# Altium PCB Touch_Board_AB.PcbDoc
Units mil, origin at the board's own origin, x right, y up, seen from the top; angles counter-clockwise.
Board outline 5551.18 x 1023.62 mil, 2 copper layers (Top Layer, Bottom Layer), stack 57 mil thick; 44 components, 30 nets, 101 pads, 32 vias.
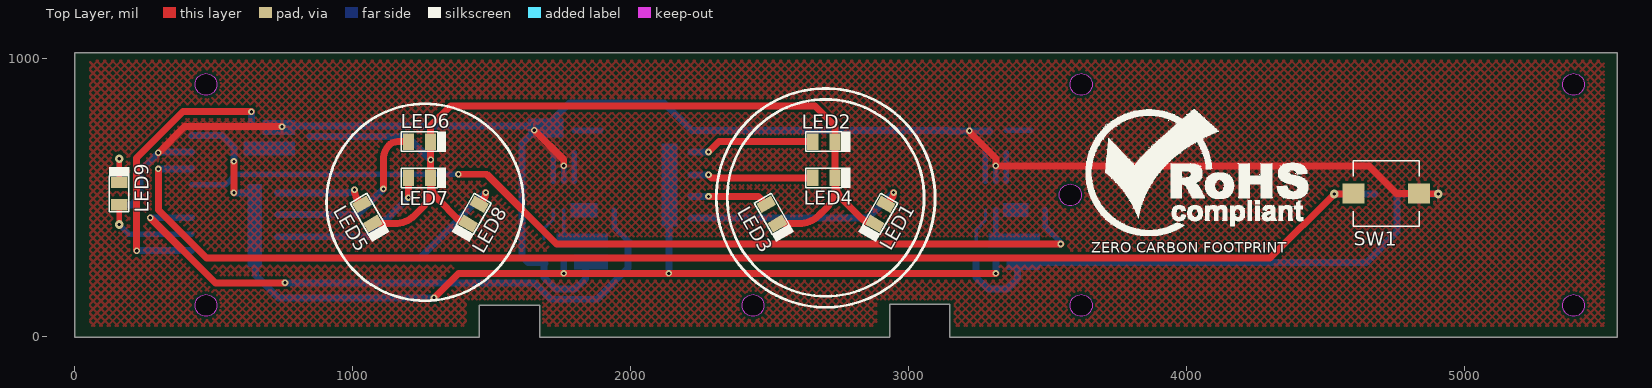
[diagram p0: Top Layer view]
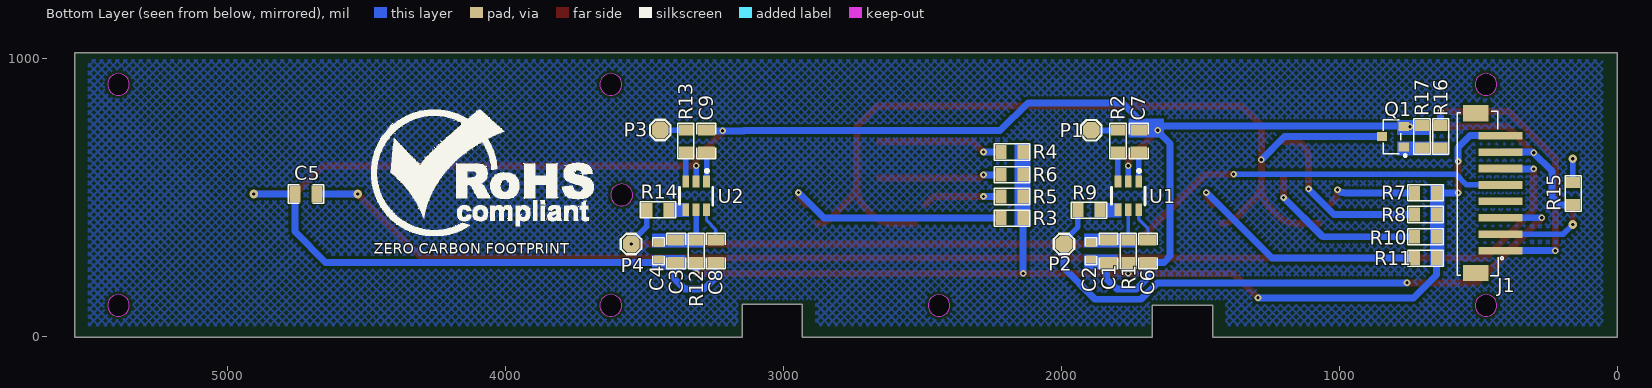
[diagram p1: Bottom Layer view, seen from below]
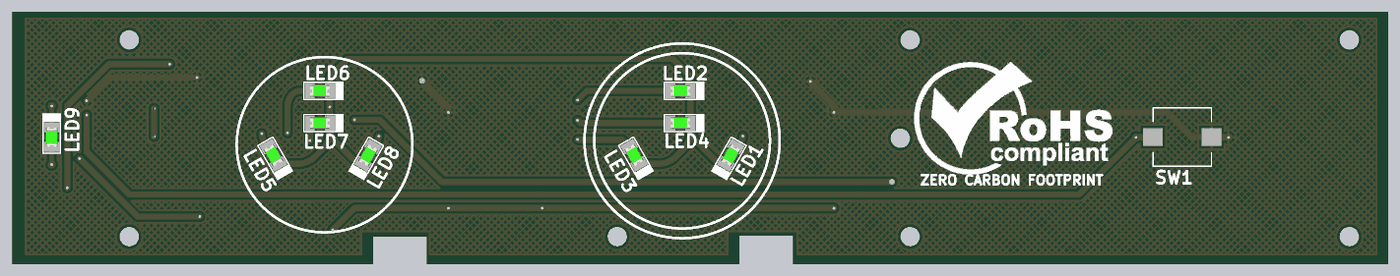
[diagram p2: 3D render of the assembled board from above, using the file's embedded part models]
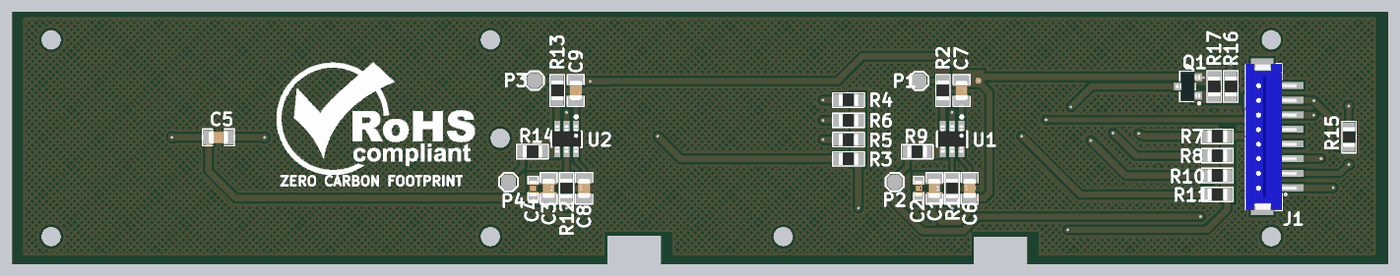
[diagram p3: 3D render of the assembled board from below, using the file's embedded part models]

## Layer stack, top to bottom
Top Solder: solder mask 3, Solder Resist, Dk 3.5
Top Layer: signal copper 10
Dielectric 1: dielectric 37, FR-4, Dk 4.8
Bottom Layer: signal copper 10
Bottom Solder: solder mask 3, Solder Resist, Dk 3.5

## Board outline
0.12,-1.29 0.12,1022.33 5551.3,1022.33 5551.3,-1.29 3149.72,-1.29 3149.72,116.82 2933.19,116.82 2933.19,-1.29 1673.34,-1.29 1673.34,112.88 1456.81,112.88 1456.81,-1.29
cut-out: 2441.06,73.51 cw(c2441.06,112.88) 2401.69,112.88 cw(c2441.06,112.88) 2441.06,152.25 cw(c2441.06,112.88) 2480.43,112.88 cw(c2441.06,112.88)
cut-out: 5393.82,868.79 cw(c5393.82,908.16) 5354.45,908.16 cw(c5393.82,908.16) 5393.82,947.53 cw(c5393.82,908.16) 5433.19,908.16 cw(c5393.82,908.16)
cut-out: 5393.82,73.51 cw(c5393.82,112.88) 5354.45,112.88 cw(c5393.82,112.88) 5393.82,152.25 cw(c5393.82,112.88) 5433.19,112.88 cw(c5393.82,112.88)
cut-out: 3622.16,73.51 cw(c3622.16,112.88) 3582.79,112.88 cw(c3622.16,112.88) 3622.16,152.25 cw(c3622.16,112.88) 3661.53,112.88 cw(c3622.16,112.88)
cut-out: 3582.79,471.15 cw(c3582.79,510.52) 3543.42,510.52 cw(c3582.79,510.52) 3582.79,549.89 cw(c3582.79,510.52) 3622.16,510.52 cw(c3582.79,510.52)
cut-out: 3622.16,868.79 cw(c3622.16,908.16) 3582.79,908.16 cw(c3622.16,908.16) 3622.16,947.53 cw(c3622.16,908.16) 3661.53,908.16 cw(c3622.16,908.16)
cut-out: 472.56,73.51 cw(c472.56,112.88) 433.19,112.88 cw(c472.56,112.88) 472.56,152.25 cw(c472.56,112.88) 511.93,112.88 cw(c472.56,112.88)
cut-out: 472.56,868.79 cw(c472.56,908.16) 433.19,908.16 cw(c472.56,908.16) 472.56,947.53 cw(c472.56,908.16) 511.93,908.16 cw(c472.56,908.16)

## Design rules (kind name [scope] priority, off if disabled: settings)
Clearance [All] p1: gap=10 ignorepadtopadclearanceinfootprint=FALSE except(0: Arc-Hole Track-Hole SMDPad-Hole THPad-Hole Via-Hole Fill-Hole Poly-Hole Region-Hole Text-Hole)
ComponentClearance [All] p1: gap=0 collisioncheckmode=3 verticalgap=0 showdistances=FALSE
HoleSize [All] p1: absolutevalues=TRUE maxlimit=1000 minlimit=1 maxpercent=80.000 minpercent=20.000
HoleToHoleClearance [All] p1: gap=0 allowstackedmicrovias=TRUE
MinimumSolderMaskSliver [All] p1: minsoldermaskwidth=0
PolygonConnect [All] p1: connectstyle=Relief reliefconductorwidth=10 reliefentries=4 polygonreliefangle="90 Angle" airgapwidth=10
RoutingVias [All] p1: holewidth=11.81 width=23.62 viastyle="Through Hole" minholewidth=7.87 minwidth=17.72 maxholewidth=11.81 maxwidth=23.62
SilkToSilkClearance [All] p1: silktosilkclearance=0
SilkToSolderMaskClearance [IsPad] p1: minsilkscreentomaskgap=0 clearancetoexposedcopper=TRUE
SolderMaskExpansion SolderMaskExpansion_1 [IsVia] p1: expansion=4 istentingtop=FALSE soldermaskfromhole=TRUE
SolderMaskExpansion [Not IsVia] p2: expansion=4 istentingtop=FALSE
Width [All] p1: maxlimit=100 minlimit=10 preferedwidth=12 minimp=50.000000 maximp=50.000000 favimp=50.000000
24 further rules are at their usual default settings.

## Classes and differential pairs
component class U_Touch_Sensor_Section: C1 C2 C3 C4 C6 C7 C8 C9 P1 P2 P3 P4 R1 R2 R9 R12 R13 R14 U1 U2
component class U_LED_Section: C5 J1 LED1 LED2 LED3 LED4 LED5 LED6 LED7 LED8 LED9 Q1 R3 R4 R5 R6 R7 R8 R10 R11 R15 R16 R17 SW1

## Components (designator, comment, footprint, x,y, rotation, side; value= is the part's Value field where it differs from the comment)
C1 "0.1uF" Cap0805 1831,308 r270 bottom
C2 "10uF" Cap0603 1894,308 r270 bottom
C3 "0.1uF" Cap0805 3387,308 r270 bottom
C4 "10uF" Cap0603 3450,308 r270 bottom
C5 "0.1uF" Cap0805 4719,514 r0 bottom
C6 "0.1uF" Cap0805 1689,308 r90 bottom
C7 "0.1uF" Cap0805 1722,704 r270 bottom
C8 "0.1uF" Cap0805 3244,308 r90 bottom
C9 "0.1uF" Cap0805 3278,704 r270 bottom
J1 "B8B-ZR-SM4-TF(LF)(SN)" B8B-ZR-SM4-TF(LF)(SN) 465,516.9 r90 bottom locked
LED1 "150080GS75000" "LED 0805" 2899,442 r240 top
LED2 "150080GS75000" "LED 0805" 2696,702 r0 top
LED3 "150080GS75000" "LED 0805" 2509,442 r300 top
LED4 "150080GS75000" "LED 0805" 2696,572 r0 top
LED5 "150080GS75000" "LED 0805" 1054,442 r300 top
LED6 "150080GS75000" "LED 0805" 1241,702 r0 top
LED7 "150080GS75000" "LED 0805" 1241,572 r0 top
LED8 "150080GS75000" "LED 0805" 1436,442 r240 top
LED9 "150080GS75000" "LED 0805" 160,515 r90 top locked
P1 "Test Point" "TEST POINT" 1893,743 r180 bottom
P2 "Test Point" "TEST POINT" 1991,334 r180 bottom
P3 "Test Point" "TEST POINT" 3444,744 r180 bottom
P4 "Test Point" "TEST POINT" 3549,334 r180 bottom
Q1 "S8050" sot-23 808,720 r90 bottom
R1 "100R" "RES 0805" 1760,308 r270 bottom
R2 "10K" "RES 0805" 1797,704 r270 bottom
R3 "100R" "RES 0805" 2178,427 r180 bottom
R4 "100R" "RES 0805" 2178,665 r180 bottom
R5 "100R" "RES 0805" 2178,505 r180 bottom
R6 "100R" "RES 0805" 2178,583 r180 bottom
R7 "100R" "RES 0805" 690,518 r180 bottom
R8 "100R" "RES 0805" 690,440 r180 bottom
R9 "1K" "RES 0805" 1901,456 r180 bottom
R10 "100R" "RES 0805" 690,360 r180 bottom
R11 "100R" "RES 0805" 690,283 r180 bottom
R12 "100R" "RES 0805" 3315,308 r270 bottom
R13 "10K" "RES 0805" 3352,704 r270 bottom
R14 "1K" "RES 0805" 3452.59,456.59 r180 bottom
R15 "100R" "RES 0805" 159,515 r90 bottom
R16 "1K5" "RES 0805" 636,720 r90 bottom
R17 "10K" "RES 0805" 703,720 r90 bottom
SW1 "TVFU03" TVFU03 4720.04,515.4 r0 top locked value=Custom
U1 "RH6016D" SOT-23-6 1760,508 r270 bottom locked value=Custom
U2 "RH6016D" SOT-23-6 3315,508 r270 bottom locked value=Custom

## Footprints (in the part's own frame and the unit in brackets; to place one, negate y for a bottom-side part, rotate by r counter-clockwise, add the part's x,y. Pads: shape width x height; smd on the part's side, far side on the other; paste and mask are expansions set on the pad)
B8B-ZR-SM4-TF(LF)(SN) [mm] "ZH Header Male Pin 0.059\"(1.50mm) 8 SMD,P=1.5mm Wire To Board / Wire To Wire Connector RoHS"
  rect 0.7x4 smd: 1(-5.25,-1.125) 2(-3.75,-1.125) 3(-2.25,-1.125) 4(-0.75,-1.125) 5(0.75,-1.125) 6(2.25,-1.125) 7(3.75,-1.125) 8(5.25,-1.125)
  rect 1.5x2.3 smd: MP1(7.3,1.125) MP2(-7.3,1.125)
  silkscreen extent -7.57,-1.4 7.49,2.82, body extent -7.53,-2.41 7.47,2.79, height 5
Cap0603 [mil]
  rect 30x35 smd mask+2.36: 1(-30,0) 2(30,0)
  silkscreen extent -49,-21 49,21, body extent -32,-16 31,16, height 34
Cap0805 [mil] "SMD 0805"
  rect 40x60 smd mask+2.76: 1(-40,0) 2(40,0)
  silkscreen extent -64,-34 64,34, body extent -39,-25 39,25, height 30
"LED 0805" [mil]
  rect 40x60 smd: 1(-39.99,0.01) 2(40.01,0.01)
  silkscreen extent -65,-37 96,37, body extent -40,-25 40,25, height 43
"RES 0805" [mil] "SMD 0805"
  rect 40x50 smd: 1(-40,0) 2(40,0)
  silkscreen extent -64,-29 64,29, body extent -39,-25 39,24, height 24
sot-23 [mm]
  rect 0.82x0.92 smd: 1(-0.95,-1) 2(0.95,-1) 3(0,1)
  silkscreen extent -1.82,-1.23 1.56,0.86, body extent -1.5,-1.25 1.5,1.25, height 1.1
SOT-23-6 [mm] "IC BAT CHG LI-ION 1 CELL SOT23-6"
  rect 1.12x0.62 smd: 1(-1.3,0.95) 2(-1.3,0) 3(-1.3,-0.95) 4(1.3,-0.95) 5(1.3,0) 6(1.3,0.95)
  silkscreen extent -2.4,-1.52 0.86,1.52, body extent -1.4,-1.45 1.4,1.45, height 1.44
"TEST POINT" [mil]
  oct 60x60 smd: 1(0,0)
  silkscreen extent -37,-37 37,37
TVFU03 [mm]
  rect 2x1.8 smd: 1(-3,0) 2(3,0)
  silkscreen extent -3,-3 3,3

## Part data
C1 C3 C5 C6 C7 C8 C9: library part 0805B104K500CT, "CAP CER 0.1UF 50V X7R 0805", Capacitance=100nF, Case Code (Imperial)=0805, Case Code (Metric)=2012, Dielectric=X7R, Manufacturer="Walsin Technologies", Max Operating Temperature=125°C, Min Operating Temperature=-55°C, Supplier Part Number 1=1292-1647-1-ND, Tolerance=10%, Voltage=50V, Case/Package=0805, Category="Ceramic Capacitors", ComponentLink1Description=http://www.farnell.com/datasheets/2340522.pdf?src-supplier=Farnell, ComponentLink1URL=http://www.farnell.com/datasheets/2340522.pdf?src-supplier=Farnell, ComponentLink2Description=http://components.arrow.com/part/dataview/0323_00650840?src-supplier=Arrow+Europe, ComponentLink2URL=http://components.arrow.com/part/dataview/0323_00650840?src-supplier=Arrow+Europe, ComponentLink3Description=https://www.verical.com/server-webapp/html/getDatasheet?partID=414849&src-supplier=Verical, ComponentLink3URL=https://www.verical.com/server-webapp/html/getDatasheet?partID=414849&src-supplier=Verical, ComponentLink4Description=http://www.farnell.com/datasheets/2340522.pdf?src-supplier=Element14, ComponentLink4URL=http://www.farnell.com/datasheets/2340522.pdf?src-supplier=Element14, ComponentLink5Description=http://www.passivecomponent.com/wp-content/uploads/2018/10/MLCC.pdf?src-supplier=Digi-Key, ComponentLink5URL=http://www.passivecomponent.com/wp-content/uploads/2018/10/MLCC.pdf?src-supplier=Digi-Key, ComponentLink6Description=http://www.passivecomponent.com/indexsea/0805B104K500CT-IB.pdf?src-supplier=Digi-Key, ComponentLink6URL=http://www.passivecomponent.com/indexsea/0805B104K500CT-IB.pdf?src-supplier=Digi-Key, ComponentLink7Description=http://www.farnell.com/datasheets/2340522.pdf?src-supplier=Newark, ComponentLink7URL=http://www.farnell.com/datasheets/2340522.pdf?src-supplier=Newark, Depth=1.25mm, Lead Free="Lead Free", Length=2mm, Manufacturer Part Number=0805B104K500CT, Packaging="Tape and Reel", Pricing 1="1=0.12000, 10=0.08600, 50=0.04900, 100=0.04050, 500=0.02842, 1000=0.02352 (USD)", Radiation Hardening=No, REACH SVHC=Unknown, RoHS=Yes, Stock 1=1274242, Supplier 1=Digi-Key, Voltage Rating=50V, Voltage Rating (DC)=50V
C2 C4: library part C1608X5R1E106M080AC, "CAP CER 10UF 25V X5R 0603", Case Code (Imperial)=0603, Case Code (Metric)=1608, Dielectric=X5R, Dielectric Material=Ceramic, Manufacturer=TDK, Max Operating Temperature=85°C, Min Operating Temperature=-55°C, Package Quantity=1, Supplier Part Number 1=445-9015-1-ND, Tolerance=20%, Voltage Rating=25V, Capacitance=10uF, Case/Package=0603, Category="Ceramic Capacitors", ComponentLink1Description=http://components.arrow.com/part/dataview/0323_06887183?src-supplier=Arrow+Europe, ComponentLink1URL=http://components.arrow.com/part/dataview/0323_06887183?src-supplier=Arrow+Europe, ComponentLink2Description=http://www.farnell.com/datasheets/2792994.pdf?src-supplier=Farnell, ComponentLink2URL=http://www.farnell.com/datasheets/2792994.pdf?src-supplier=Farnell, ComponentLink3Description=http://www.farnell.com/datasheets/2291921.pdf?src-supplier=Avnet, ComponentLink3URL=http://www.farnell.com/datasheets/2291921.pdf?src-supplier=Avnet, ComponentLink4Description=http://www.farnell.com/datasheets/1470445.pdf?src-supplier=Newark, ComponentLink4URL=http://www.farnell.com/datasheets/1470445.pdf?src-supplier=Newark, ComponentLink5Description=http://www.farnell.com/datasheets/2291921.pdf?src-supplier=Newark, ComponentLink5URL=http://www.farnell.com/datasheets/2291921.pdf?src-supplier=Newark, ComponentLink6Description=http://www.farnell.com/datasheets/2792994.pdf?src-supplier=Element14, ComponentLink6URL=http://www.farnell.com/datasheets/2792994.pdf?src-supplier=Element14, ComponentLink7Description=http://www.farnell.com/datasheets/1913358.pdf?src-supplier=Element14, ComponentLink7URL=http://www.farnell.com/datasheets/1913358.pdf?src-supplier=Element14, ComponentLink8Description=https://product.tdk.com/info/en/catalog/datasheets/mlcc_commercial_general_en.pdf?src-supplier=Digi-Key, ComponentLink8URL=https://product.tdk.com/info/en/catalog/datasheets/mlcc_commercial_general_en.pdf?src-supplier=Digi-Key, ComponentLink9Description=http://www.farnell.com/datasheets/2291921.pdf?src-supplier=RSComponents, ComponentLink9URL=http://www.farnell.com/datasheets/2291921.pdf?src-supplier=RSComponents, ComponentLink10Description=http://www.farnell.com/datasheets/2291921.pdf?src-supplier=Verical, ComponentLink10URL=http://www.farnell.com/datasheets/2291921.pdf?src-supplier=Verical, ComponentLink11Description=http://www.farnell.com/datasheets/2291921.pdf?src-supplier=Mouser, ComponentLink11URL=http://www.farnell.com/datasheets/2291921.pdf?src-supplier=Mouser, ComponentLink12Description=http://www.farnell.com/datasheets/2792994.pdf?src-supplier=Newark, ComponentLink12URL=http://www.farnell.com/datasheets/2792994.pdf?src-supplier=Newark, ComponentLink13Description=http://www.farnell.com/datasheets/2291921.pdf?src-supplier=Quest, ComponentLink13URL=http://www.farnell.com/datasheets/2291921.pdf?src-supplier=Quest, ComponentLink14Description=http://www.farnell.com/datasheets/2291921.pdf?src-supplier=TTI, ComponentLink14URL=http://www.farnell.com/datasheets/2291921.pdf?src-supplier=TTI, Construction=Flat, Depth=0.8mm, Height=0.8mm, Lead Free="Lead Free", Length=1.6mm, Manufacturer Part Number=C1608X5R1E106M080AC, Mount="Surface Mount", Packaging="Tape and Reel", Pricing 1="1=0.86000, 10=0.60700, 50=0.45920, 100=0.39990, 500=0.29624, 1000=0.25180 (USD)", REACH SVHC="No SVHC", Resistor Type=Ceramic, RoHS=Yes, RoHS Compliant=Yes, Series=C, Stock 1=217631, Supplier 1=Digi-Key, Termination=SMD/SMT, Thickness=0.039inch, Voltage Rating (DC)=25V, Weight=7.1E-05oz, Width=0.8mm
J1: "Conn Shrouded Header HDR 8 POS 1.5mm Solder ST SMD T/R", Color=Natural, Contact Resistance=30mR, Current Rating=1A, Housing Color=Beige, Manufacturer=JST, Max Operating Temperature=85°C, Max Voltage Rating (AC)=50V, Min Operating Temperature=-25°C, Supplier Part Number 1=455-1687-1-ND, Category="Board to Board Connectors", ComponentLink1Description=https://datasheet.ciiva.com/26894/getdatasheetpartid-640747-26894507.pdf?src-supplier=Verical, ComponentLink1URL=https://datasheet.ciiva.com/26894/getdatasheetpartid-640747-26894507.pdf?src-supplier=Verical, ComponentLink2Description=https://datasheet.ciiva.com/16418/ezr-16418253.pdf?src-supplier=Future+Electronics, ComponentLink2URL=https://datasheet.ciiva.com/16418/ezr-16418253.pdf?src-supplier=Future+Electronics, Connector Type="Male Pin", Contact Material=Tin,Brass, Contact Plating=Tin,Copper, Depth=6.5mm, Fastening Type=Detent, Gender=Male, Height=7.2mm, Housing Material=Polyamide, Lead Free="Lead Free", Length=15mm, Manufacturer Part Number=B8B-ZR-SM4-TF(LF)(SN), Max Current Rating=1A, Mount="Surface Mount", Number of Contacts=8, Number of Positions=8, Number of Rows=1, Orientation="Right Angle", Packaging="Tape and Reel", Pitch=1.5mm, Pricing 1="1=0.80000, 10=0.70700, 100=0.60970, 500=0.49886 (USD)", RoHS=Yes, Supplier 1=Digi-Key, Termination=Solder, Width=3.5mm
LED1 LED2 LED3 LED4 LED5 LED6 LED7 LED8 LED9: "LED GREEN CLEAR 0805 SMD", Case Code (Imperial)=0805, Case Code (Metric)=2012, Color=Green, Forward Current=30mA, Forward Voltage=3.2V, Manufacturer="Wurth Electronics", Max Operating Temperature=85°C, Min Operating Temperature=-40°C, Package Quantity=4000, Supplier Part Number 1=732-4983-1-ND, Test Current=20mA, Case/Package=0805, Category=LEDs, ComponentLink1Description=https://datasheet.ciiva.com/29563/150080gs75000-29563008.pdf?src-supplier=Digi-Key, ComponentLink1URL=https://datasheet.ciiva.com/29563/150080gs75000-29563008.pdf?src-supplier=Digi-Key, ComponentLink2Description=https://datasheet.ciiva.com/29279/759434-da-01-en-chipled-0805-w-kl-gruen-150080gs75000-29279039.pdf?src-supplier=Conrad, ComponentLink2URL=https://datasheet.ciiva.com/29279/759434-da-01-en-chipled-0805-w-kl-gruen-150080gs75000-29279039.pdf?src-supplier=Conrad, Dominant Wavelength=520nm, Height=0.7mm, Length=2mm, Lens Style=Clear,Rectangular, Luminous Intensity=450mcd, Manufacturer Part Number=150080GS75000, Mount="Surface Mount", Packaging="Cut Tape", Pricing 1="1=0.18000, 50=0.16500, 100=0.14200, 500=0.12300 (USD)", REACH SVHC=Unknown, RoHS=Yes, RoHS Compliant=Yes, Stock 1=96823, Supplier 1=Digi-Key, Viewing Angle=140°, Wavelength=520nm, Width=1.25mm
P1 P2 P3 P4: library part "TEST POINT", "Test Point ON"
Q1: "NPN 500mA 25V 300mW SOT-23(SOT-23-3) Bipolar Transistors - BJT RoHS", Current - Collector (Ic) (Max)=500mA, Manufacturer=Shikues, Package=SOT-23(SOT-23-3), Power-max=300mW, Voltage - Collector Emitter Breakdown (Max)=25V, Transistor Type=NPN
R1 R3 R4 R5 R6 R7 R8 R10 R11 R12 R15: library part ERA6VEB1000V, "Res SMD 100 Ohm 0.10% 1/8W 0805", Manufacturer=Panasonic, Manufacturer Part Number=ERA-6VEB1000V, Supplier Part Number 1=10-ERA-6VEB1000VCT-ND, Category="Chip SMD Resistors", Pricing 1="1=0.56000, 10=0.46700, 100=0.31350, 1000=0.18342, 2500=0.18142 (USD)", RoHS=No, Stock 1=2703, Supplier 1=Digi-Key
R2 R13 R17: library part RMCF0805FT10K0, "RES 10K OHM 1% 1/8W 0805", Case Code (Imperial)=0805, Case Code (Metric)=2012, Manufacturer="Stackpole Electronics", Max Operating Temperature=155°C, Max Power Dissipation=125mW, Min Operating Temperature=-55°C, Resistance=10kR, Resistor Type="Thick Film", Supplier Part Number 1=RMCF0805FT10K0CT-ND, Temperature Coefficient=100ppm/°C, Tolerance=1%, Case/Package=0805, Category="Chip SMD Resistors", ComponentLink1Description=https://datasheet.ciiva.com/15193/getdatasheetpartid-362046-15193525.pdf?src-supplier=Verical, ComponentLink1URL=https://datasheet.ciiva.com/15193/getdatasheetpartid-362046-15193525.pdf?src-supplier=Verical, Construction=Rectangular, Contact Plating=Tin,Matte, Depth=1.25mm, Features="Automotive AEC-Q200", Height=0.026inch, Lead Free="Lead Free", Length=2mm, Manufacturer Part Number=RMCF0805FT10K0, Military Standard=Not, Mount="Surface Mount", Number of Terminations=2, Packaging="Tape and Reel", Power Rating=125mW, Pricing 1="1=0.10000, 10=0.02700, 100=0.01090, 1000=0.00488, 2500=0.00423 (USD)", Radiation Hardening=No, RoHS=Yes, RoHS Compliant=Yes, Series=RMCF, Size Code=0805, Stock 1=308321, Supplier 1=Digi-Key, Width=0.049inch
R9 R14: library part CRCW08051K00JNEB, "RES SMD 1K OHM 5% 1/8W 0805", Case Code (Imperial)=0805, Case Code (Metric)=2012, Manufacturer="Vishay Dale", Max Operating Temperature=155°C, Max Power Dissipation=125mW, Min Operating Temperature=-55°C, Package Quantity=10000, Resistance=1kR, Resistor Type="Thick Film", Supplier Part Number 1=541-CRCW08051K00JNEBCT-ND, Temperature Coefficient=200ppm/°C, Tolerance=5%, Voltage Rating=150V, Case/Package=0805, Category="Chip SMD Resistors", ComponentLink1Description=https://datasheet.ciiva.com/5548/dcrcwe3-109170-5548326.pdf?src-supplier=Mouser, ComponentLink1URL=https://datasheet.ciiva.com/5548/dcrcwe3-109170-5548326.pdf?src-supplier=Mouser, ComponentLink2Description=https://datasheet.ciiva.com/28621/1747939-28621434.pdf?src-supplier=Element14, ComponentLink2URL=https://datasheet.ciiva.com/28621/1747939-28621434.pdf?src-supplier=Element14, Contact Plating=Tin, Features="Automotive AEC-Q200", Height=0.02inch, Lead Free="Lead Free", Length=0.079inch, Manufacturer Part Number=CRCW08051K00JNEB, Number of Pins=2, Number of Terminations=2, Packaging="Tape and Reel", Power Rating=125mW, Pricing 1="1=0.10000, 10=0.05000, 100=0.02040, 1000=0.00914, 2500=0.00794, 5000=0.00656 (USD)", Radiation Hardening=No, REACH SVHC=Unknown, RoHS=Yes, Stock 1=4389, Supplier 1=Digi-Key, Termination=SMD/SMT, Voltage Rating (DC)=150V, Weight=0.000194oz, Width=0.049inch
R16: library part RC0805JR-071K5L, "RES SMD 1K5 0.125W ±5% 0805", Case Code (Imperial)=0805, Case Code (Metric)=2012, Manufacturer=Yageo, Max Operating Temperature=155°C, Max Power Dissipation=125mW, Min Operating Temperature=-55°C, Package Quantity=1, Resistance=1.5kR, Resistance Tolerance=5%, Resistor Type="Thick Film", Supplier Part Number 1=1655711, Temperature Coefficient=100ppm/°C, Voltage Rating=150V, Case/Package=0805, Category="Chip SMD Resistors", ComponentLink1Description=https://datasheet.ciiva.com/2456/pyu-r-int-thick-7-2456073.pdf?src-supplier=Digi-Key, ComponentLink1URL=https://datasheet.ciiva.com/2456/pyu-r-int-thick-7-2456073.pdf?src-supplier=Digi-Key, ComponentLink2Description=https://datasheet.ciiva.com/2456/pyu-r-int-thick-7-2456074.pdf?src-supplier=Digi-Key, ComponentLink2URL=https://datasheet.ciiva.com/2456/pyu-r-int-thick-7-2456074.pdf?src-supplier=Digi-Key, ComponentLink3Description=https://datasheet.ciiva.com/17026/rc0805-17026842.pdf?src-supplier=Future+Electronics, ComponentLink3URL=https://datasheet.ciiva.com/17026/rc0805-17026842.pdf?src-supplier=Future+Electronics, ComponentLink4Description=https://datasheet.ciiva.com/46395/444164-46395130.pdf?src-supplier=Element14, ComponentLink4URL=https://datasheet.ciiva.com/46395/444164-46395130.pdf?src-supplier=Element14, ComponentLink5Description=https://datasheet.ciiva.com/2456/pyu-r-int-thick-7-2456075.pdf?src-supplier=Digi-Key, ComponentLink5URL=https://datasheet.ciiva.com/2456/pyu-r-int-thick-7-2456075.pdf?src-supplier=Digi-Key, Construction=Rectangular, Contact Plating=Tin,Matte,Lead, Depth=1.25mm, Features="Moisture Resistant", Height=0.024inch, Lead Free="Lead Free", Length=0.079inch, Manufacturer Part Number=RC0805JR-071K5L, Military Standard=Not, Number of Terminations=2, Packaging="Tape and Reel", Power Rating=125mW, Pricing 1="5000=0.00390, 20000=0.00330, 75000=0.00320, 125000=0.00320, 250000=0.00310 (USD)", Radiation Hardening=No, REACH SVHC=Unknown, RoHS=Yes, RoHS Compliant=Yes, Series=RC, Size Code=0805, Stock 1=115000, Supplier 1="Future Electronics", Termination=SMD/SMT, Tolerance=5%, Width=0.049inch
SW1: "6mm 2 pin smd soft touch long travel silent tact switch", Manufacturer="Zhejiang, China", Package=Custom, ComponentLink1Description="Supplier Link", ComponentLink1URL=https://www.alibaba.com/product-detail/6mm-2-pin-smd-soft-touch_324641074.html, Manufacturer Part No=TVFU03
U1 U2: "SOT23-6 Touch Sensors ROHS", Manufacturer="RONGHE Microelectronics", Package=SOT23-6, ComponentLink1Description=LCSC, ComponentLink1URL=https://lcsc.com/product-detail/Touch-Sensors_RONGHE-Microelectronics-RH6016D_C309685.html, Manufacturer Part No=RH6016D

## Via types
v1: diameter 23.62, hole 11.81, Top Layer to Bottom Layer, tented both sides, 26 vias
v2: diameter 31.5, hole 11.81, Top Layer to Bottom Layer, tented both sides, 4 vias
v3: diameter 23.62, hole 11.81, Top Layer to Bottom Layer, 2 vias

## Nets (pads, with @x,y where several pads share a name; then routed paths per layer and width w, separated by ;. In a path a pad name is that pad's centre, name@x,y a point inside that pad or via, vN(x,y) a via of type N, cw(c..) or ccw(c..) an arc to the next point about the centre after c; other vN are vias at no path point)
3V3: J1.8 R1.2 R3.2 R4.2 R5.2 R6.2 R7.2 R8.2 R10.2 R11.2 R12.2 | length 3483.9
  Top Layer w25: v1(573,517.9) v1(573,631) ; v1(1293,140) 1381,228 v1(1760,228) v1(2138,228) v1(3315,228)
  Bottom Layer w25: J1.8 530.41,723.59 573,681 v1(573,631) ; v1(573,517.9) 649.9,517.9 R7.2 ; R11.2 650,223 733,140 v1(1293,140) ; v1(1760,228) R1.2@1760,267 ; v1(2138,228) R3.2 ; v1(3315,228) R12.2
B_LED: J1.2 LED9.1 | length 346.1
  Top Layer w20: v2(160,404) LED9.1
  Bottom Layer w20: v2(160,404) 194.74,369.26 J1.2
BJT_C: LED1.2 LED2.2 LED3.2 LED4.2 LED5.2 LED6.2 LED7.2 LED8.2 Q1.3 | length 3399.1
  Top Layer w25: LED5.2 1151.94,407.36 ccw(c1151.94,507.36) 1222.65,436.65 1251.72,465.72 ccw(c1181.01,536.43) 1281.01,536.43 ; LED7.2@1281.01,562.41 ccw(c1381.01,562.41) 1310.3,491.7 1373.89,428.11 ccw(c1424,478.21) LED8.2@1424,407.35 ; LED7.2 v1(1281.01,637) LED6.2 1281.01,760.01 1352,831 2664,831 2736.01,758.99 LED2.2 LED4.2 LED4.2@2736.01,562.41 ; LED8.2@1410.19,407.35 LED8.2 ; LED3.2 2606.94,407.36 ccw(c2606.94,507.36) 2677.65,436.65 2706.72,465.72 ccw(c2636.01,536.43) 2736.01,536.43 LED4.2@2736.01,562.41 ; LED1.2 cw(c2879,478.21) 2828.89,428.11 2765.3,491.7 cw(c2836.01,562.41) LED4.2@2736.01,562.41
  Bottom Layer w25: Q1.3 1198.01,720 v1(1281.01,637)
GND: C1.2 C2.2 C3.2 C4.2 C5.2 C6.1 C7.1 C8.1 C9.1 J1.7 Q1.2 R15.1 R17.2 SW1.2 U1.2 U2.2 | length 8385.8
  Top Layer w25: v1(301,662) 395,756 v1(746,756) ; v3(1654,743) 1760,637 v1(1760,615) ; v1(3220,741) 3220,737 3315,642 v1(3315,615) 4657,615 4756.6,515.4 SW1.2 4838.85,514.7 4906.3,514.7 v2(4907,514)
  Bottom Layer w20: U1.2 v1(1760,615) ; U2.2 v1(3315,615)
  Bottom Layer w25: R15.1 205,475 235,505 235,596 v1(301,662) 303.54,664.54 J1.7 ; Q1.2 768.63,758.64 1638.36,758.64 v3(1654,743) 1654,740 1609,695 1609,290 1631,268 C6.1@1687,268 ; C6.1 C6.1@1687,268 ; C6.1@1692,263 C6.1@1689,266 ; C7.1@1723,743 1723,784 1781,842 2121,842 2221,742 3142,742 3143,741 v1(3220,741) 3292,741 C9.1@3293,742 ; C1.2@1831,272 1837.75,265.25 1837.75,208.75 1801,172 1731,172 1689,214 C6.1@1689,266 ; C8.1 3244,214 3286,172 3356,172 3392.75,208.75 C3.2@3392.75,265.25 ; C3.2@3374,278 3428,278 C4.2@3438,268 ; C4.2@3460,268 4648,268 4759,379 C5.2 v2(4907,514) ; C6.1@1687,268 C6.1@1689,266
NetC6_2: C6.2 U1.6 | length 118.7
  Bottom Layer w12: C6.2@1689,352 1689,391 1721.8,423.8 1721.8,456.02 U1.6
NetC7_2: C7.2 U1.1 | length 105.1
  Bottom Layer w20: C7.2 1722.6,663.4 U1.1
NetC8_2: C8.2 U2.6 | length 122.7
  Bottom Layer w12: C8.2 3244,385 3277.6,418.6 U2.6
NetC9_2: C9.2 U2.1 | length 104.2
  Bottom Layer w20: U2.1 C9.2@3277.6,663.4
NetLED1_1: LED1.1 R3.1 | length 820.3
  Top Layer w25: LED1.1 2936.84,494.47 ccw(c2912.31,519) v1(2947,519)
  Bottom Layer w25: R3.1@2217.34,426.86 2854.86,426.86 v1(2947,519)
NetLED2_1: LED2.1 R4.1 | length 453.3
  Top Layer w25: v1(2281,665) 2318.01,702.01 LED2.1
  Bottom Layer w25: R4.1 v1(2281,665)
NetLED3_1: LED3.1 R5.1 | length 282.8
  Top Layer w25: v1(2281,505) 2460.65,505 LED3.1
  Bottom Layer w25: R5.1 v1(2281,505)
NetLED4_1: LED4.1 R6.1 | length 442.6
  Top Layer w25: v1(2281,583) 2291.99,572.01 LED4.1
  Bottom Layer w25: R6.1 v1(2281,583)
NetLED5_1: LED5.1 R7.1 | length 340.9
  Top Layer w25: v1(1007,529) ccw(c1068.21,529) 1024.93,485.72 LED5.1
  Bottom Layer w25: R7.1 980.44,518 ccw(c980.44,555.56) v1(1007,529)
NetLED6_1: LED6.1 R8.1 | length 654.9
  Top Layer w25: v1(1111,532) 1111,639.3 cw(c1182.7,639.3) 1132,690 cw(c1160.99,661.01) 1160.99,702.01 LED6.1
  Bottom Layer w25: R8.1 1019,440 v1(1111,532)
NetLED7_1: LED7.1 R10.1 | length 600.4
  Top Layer w25: v1(1201,501) LED7.1
  Bottom Layer w25: R10.1 1060,360 v1(1201,501)
NetLED8_1: LED8.1 R11.1 | length 896.6
  Top Layer w25: LED8.1 1465.3,485.93 ccw(c1432.24,519) v1(1479,519)
  Bottom Layer w25: R11.1 1243,283 v1(1479,519)
NetLED9_2: LED9.2 R15.2 | length 172.4
  Top Layer w20: LED9.2 v2(160,641)
  Bottom Layer w12: R15.2 R15.2@160,556
  Bottom Layer w20: R15.2@160,556 v2(160,641)
NetP1_1: P1.1 R2.1 | length 95.9
  Bottom Layer w20: R2.1@1797.14,742.34 P1.1@1893,742.34
NetP3_1: P3.1 R13.1 | length 88
  Bottom Layer w20: R13.1 P3.1@3440,744
NetQ1_1: Q1.1 R16.1 R17.1 | length 67
  Bottom Layer w25: R16.1 R17.1
NetR2_2: R2.2 U1.3 | length 104
  Bottom Layer w20: R2.2@1797,663 1797,559.58 U1.3
NetR9_2: R9.2 U1.4 | length 63.9
  Bottom Layer w12: U1.4 1860.18,456.82 R9.2
NetR13_2: R13.2 U2.3 | length 104
  Bottom Layer w12: R13.2 R13.2@3352.4,663.6
  Bottom Layer w20: U2.3@3352,559.58 R13.2@3352,663
NetR14_2: R14.2 U2.4 | length 1.5
  Bottom Layer w20: R14.2@3412.19,456.19 R14.2
  Bottom Layer w25: U2.4 U2.4@3352.51,456.71 ; R14.2@3411.68,456.71 R14.2@3412.19,456.19
PLAY_KEY: C5.1 J1.6 SW1.1 | length 4883.2
  Top Layer w25: v1(301,604) 301,456 474,283 4302,283 v2(4533,514) 4600.53,514 SW1.1
  Bottom Layer w25: v1(301,604) 419.23,604 J1.6 ; v2(4533,514) C5.1
T_LED1: J1.1 R16.2 | length 1063
  Top Layer w25: v1(223,310) 223,643 390,810 v1(636,810)
  Bottom Layer w25: v1(223,310) 223.2,310.2 J1.1 ; R16.2 v1(636,810)
TIN_1: C1.1 C2.1 R1.1 U1.5 | length 243
  Bottom Layer w12: U1.5 1760,352 1831,352 1881.5,352 1891.5,342 C2.1@1894,342
TIN_2: C3.1 C4.1 R12.1 U2.5 | length 172
  Bottom Layer w20: R12.1 U2.5
  Bottom Layer w25: R12.1 3364,348 C3.1@3374,338
TKEY1: J1.3 P2.1 R9.1 | length 2272.3
  Top Layer w25: v1(272,428.31) 506.32,194 v1(757,194)
  Bottom Layer w20: R9.1 1941,395.81 P2.1@1999.41,337.41
  Bottom Layer w25: v1(272,428.31) J1.3 ; v1(757,194) 1655,194 1714,135 1879,135 1991,247 1991,329 P2.1@1999.41,337.41
TKEY2: J1.5 P4.1 R14.1 | length 3391
  Top Layer w25: v1(1381,585) 1483,585 1734,334 v3(3549,334)
  Bottom Layer w20: J1.5 542.43,546.43 581,585 v1(1381,585) ; R14.1 3492.59,396.41 P4.1@3551,338
pads on no net: J1.4 J1.MP1 J1.MP2

## Polygon pours and split planes (outlines as drawn)
GND on Top Layer "Top Layer-GND" (hatched 45Degree grid 20 track 8, remove dead copper, pour order 3): 55,40 55,993.57 5503,993.57 5503,40 3167,40 3167,134 2884.89,134 2884.89,40 1685,40 1685,134 1408.51,134 1408.51,40
no net on Bottom Layer "Bottom Layer-No Net" (hatched 45Degree grid 20 track 8, remove dead copper, pour order 8): 54,41.43 54,995 5502,995 5502,41.43 3166,41.43 3166,135.43 2883.89,135.43 2883.89,41.43 1684,41.43 1684,135.43 1407.51,135.43 1407.51,41.43

## Other copper
Bottom Layer:
  rectangle net NetR14_2: 3340,430.71 3432.68,481.71
  rectangle net NetR9_2: 1785,430 1882,481
  rectangle net TIN_1: 1734,322 1919,372
  rectangle net GND: 1632,718 1759,786
  region net 3V3: 673.6,251 673.6,549.37 622.6,549.37 622.6,251
  rectangle net GND: 676,726.8 793,781
  rectangle net NetQ1_1: 607,652 793,703
  rectangle net GND: 1797.26,241.66 1918.86,295.66
  rectangle net 3V3: 2112,396 2169,696
  rectangle net GND: 3352.4,241 3474,295
  rectangle net TIN_2: 3289,322 3474,372

## Silkscreen, mask and mechanical layers (free items; w line width, h text height)
Top Overlay:
  drawing of 3077 lines, arcs and shapes, not listed
  text "ZERO CARBON FOOTPRINT" at 3659,303 h38
Bottom Overlay:
  drawing of 3074 lines, arcs and shapes, not listed
  text "ZERO CARBON FOOTPRINT" at 4475,299 h38
Mechanical 2:
  circle w3.94: c3582.79,510.52 r39.37
  circle w3.94: c3622.16,112.88 r39.37
  circle w3.94: c2441.06,112.88 r39.37
  circle w3.94: c472.56,112.88 r39.37
  circle w3.94: c3622.16,908.16 r39.37
  circle w3.94: c472.56,908.16 r39.37
  circle w3.94: c5393.82,112.88 r39.37
  circle w3.94: c5393.82,908.16 r39.37
  lines w3.94: 0.12,-1.29 0.12,1022.33 5551.3,1022.33 5551.3,-1.29 3149.72,-1.29 3149.72,116.82 2933.19,116.82 2933.19,-1.29 1673.34,-1.29 1673.34,112.88 1456.81,112.88 1456.81,-1.29 0.12,-1.29